# Altium PCB IR2104_SYNC_BUCK.PcbDoc
Units mm, origin at the board's own origin, x right, y up, seen from the top; angles counter-clockwise.
Board outline 100 x 100 mm, 2 copper layers (Top Layer, Bottom Layer); 62 components, 21 nets, 145 pads, 138 vias.
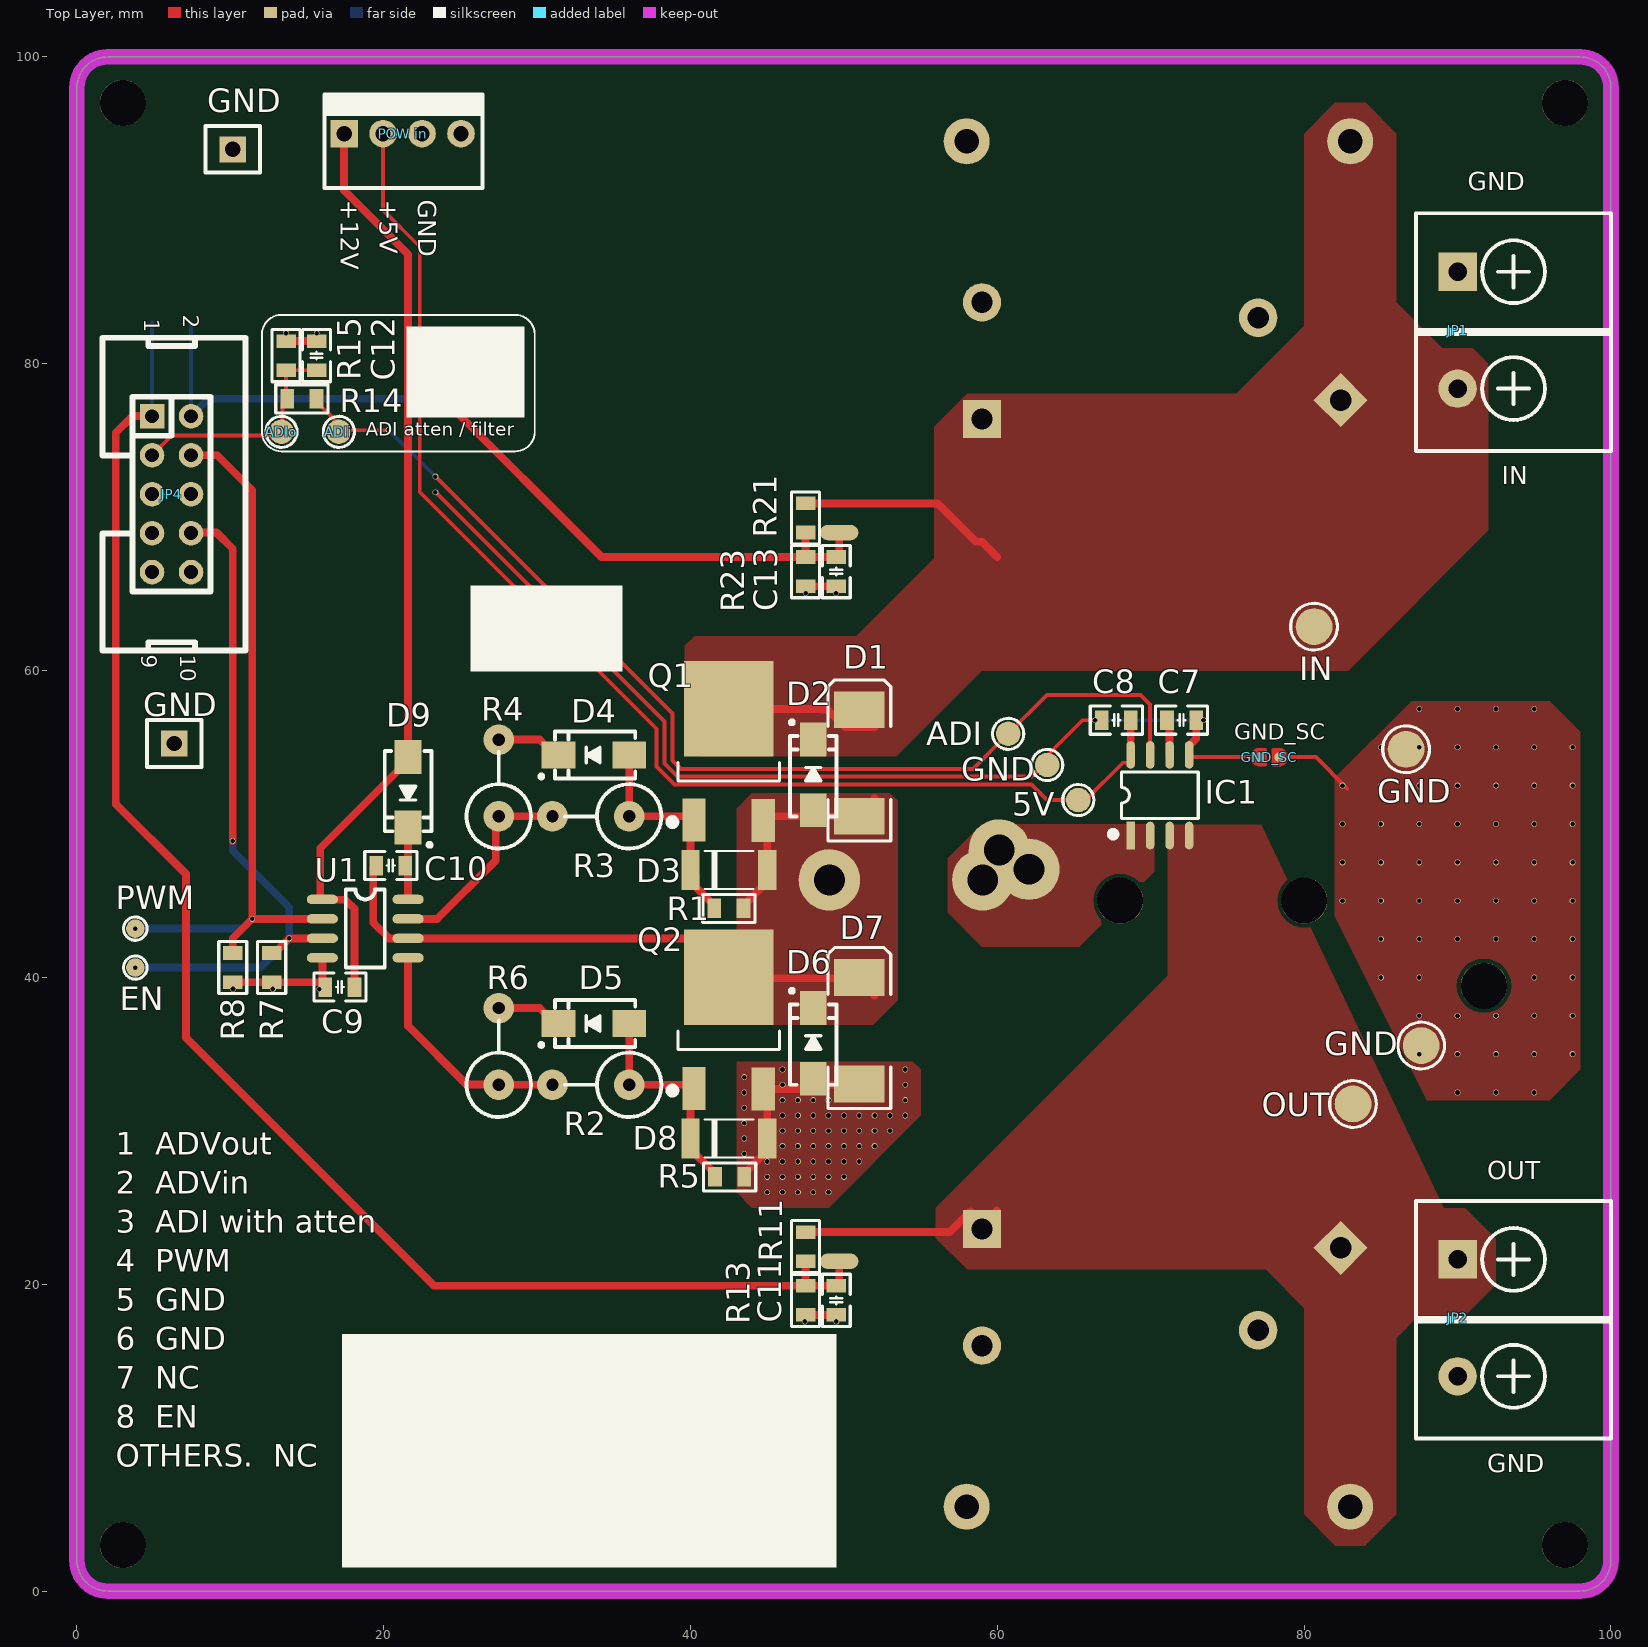
[diagram p0: Top Layer view]
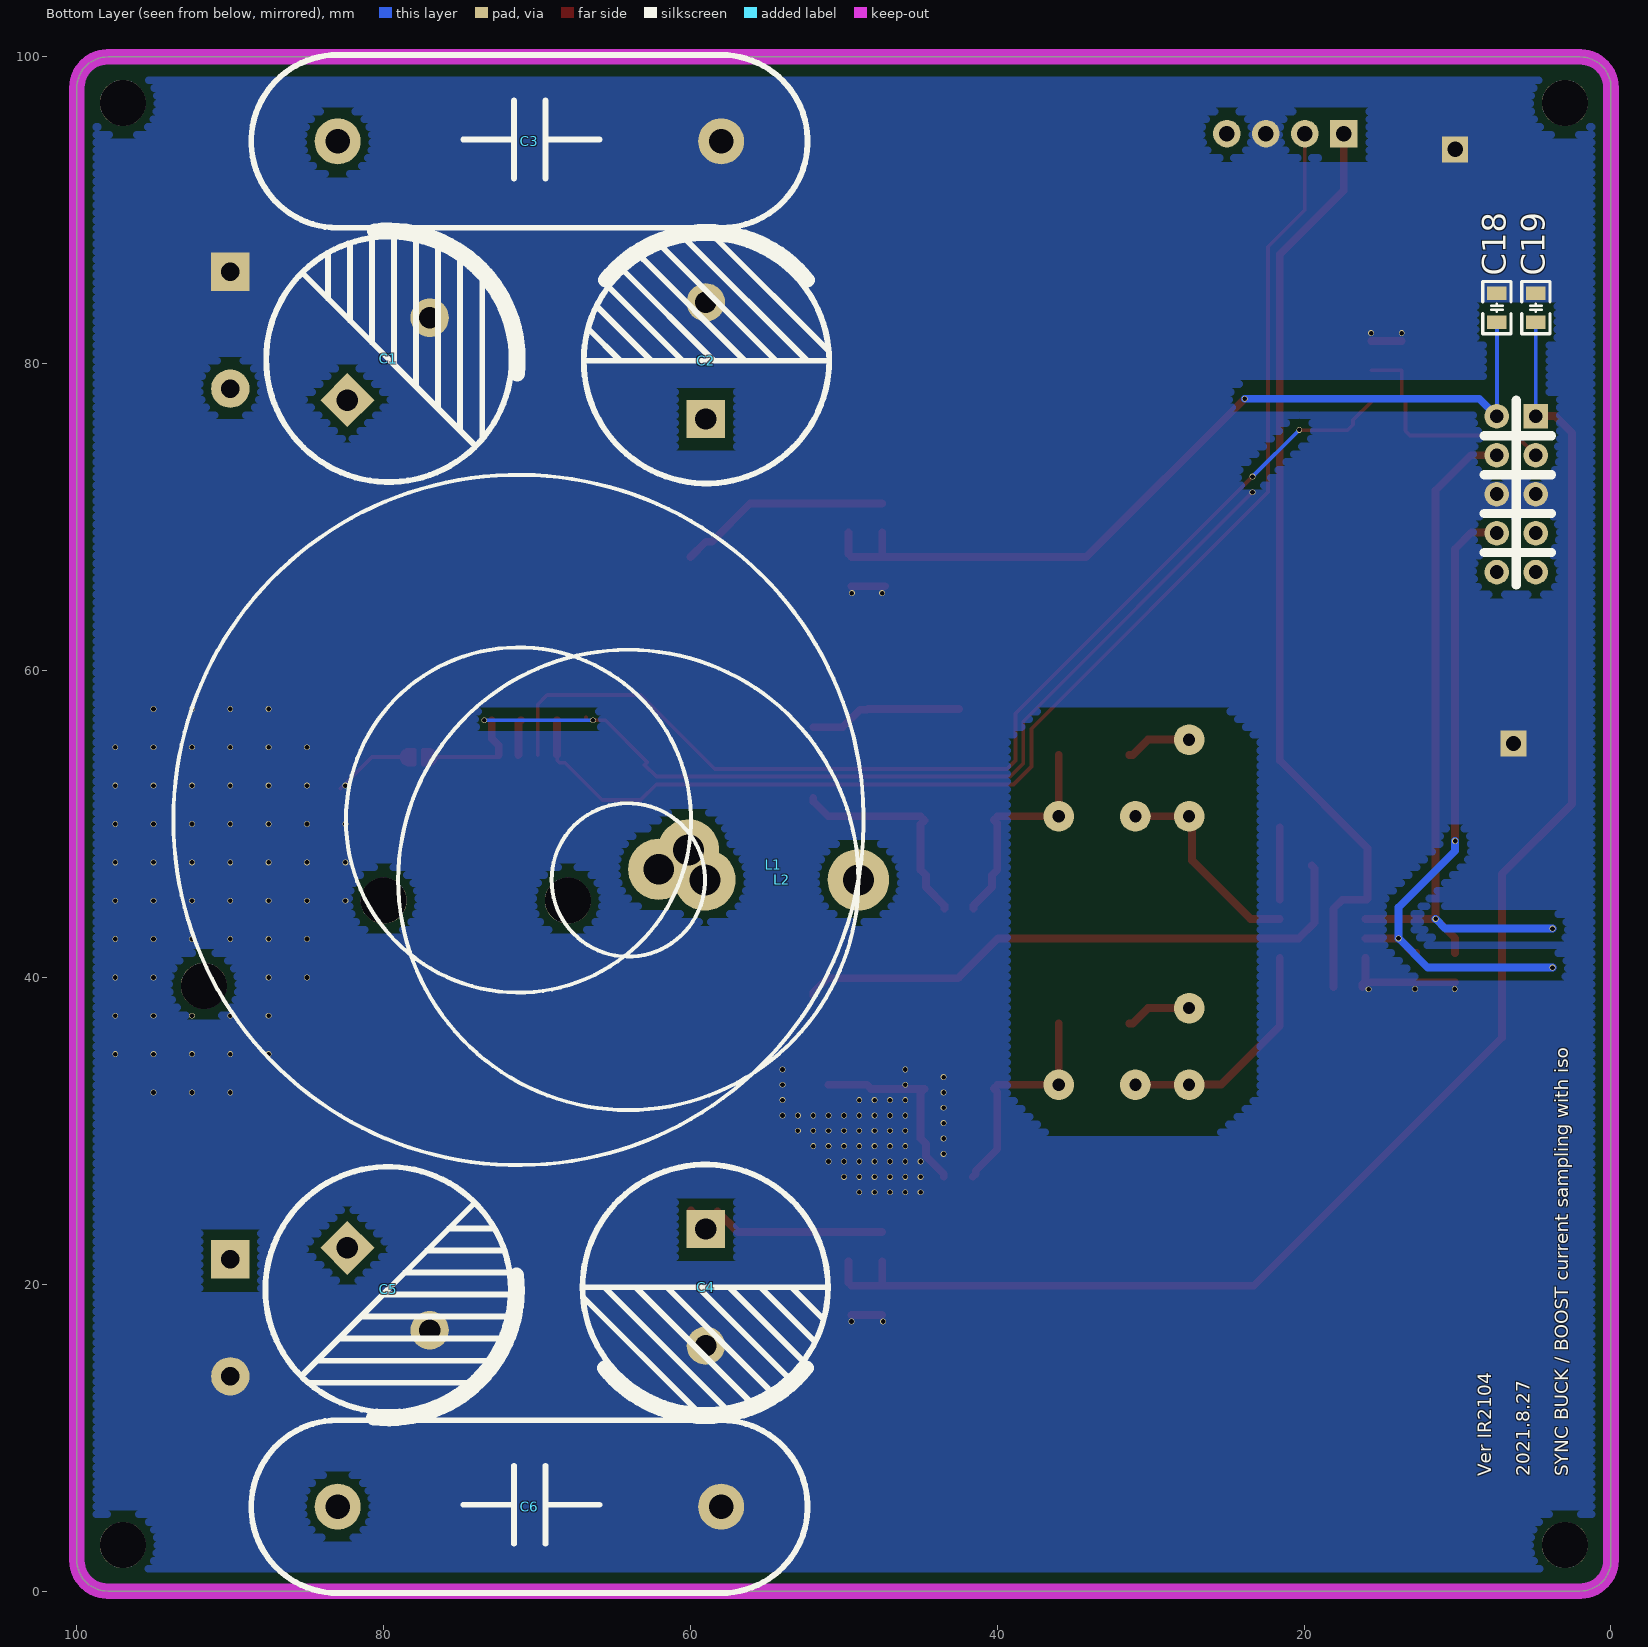
[diagram p1: Bottom Layer view, seen from below]

## Layer stack, top to bottom
Top Solder: solder mask 0.0102, Solder Resist, Dk 3.5
Top Layer: signal copper 0.0356
Dielectric 1: dielectric 0.32, FR-4, Dk 4.8
Bottom Layer: signal copper 0.0356
Bottom Solder: solder mask 0.0102, Solder Resist, Dk 3.5

## Board outline
0,2 0,98 cw(c2,98) 2,100 98,100 cw(c98,98) 100,98 100,2 cw(c98,2) 98,0 2,0 cw(c2,2)

## Design rules (kind name [scope] priority, off if disabled: settings)
Clearance GND [InNet('GND') And OnLayer('Bottom Layer')] p1: gap=0.254 ignorepadtopadclearanceinfootprint=TRUE except(0: Arc-Hole Track-Hole SMDPad-Hole THPad-Hole Via-Hole Text-Hole; 0.508: Arc-Fill Arc-Poly Arc-Region Track-Fill Track-Poly Track-Region SMDPad-Fill SMDPad-Poly SMDPad-Region THPad-Fill THPad-Poly THPad-Region Via-Fill Via-Poly Via-Region Fill-Fill Fill-Poly Fill-Region Fill-Hole Poly-Poly Poly-Region Poly-Hole Region-Region Region-Hole)
Clearance PGND_1 [InNet('PGND') And OnLayer('Bottom Layer')] p2: gap=0.254 ignorepadtopadclearanceinfootprint=TRUE except(0: Arc-Hole Track-Hole SMDPad-Hole THPad-Hole Via-Hole Text-Hole; 0.508: Arc-Fill Arc-Poly Arc-Region Track-Fill Track-Poly Track-Region SMDPad-Fill SMDPad-Poly SMDPad-Region THPad-Fill THPad-Poly THPad-Region Via-Fill Via-Poly Via-Region Fill-Fill Fill-Poly Fill-Region Fill-Hole Poly-Poly Poly-Region Poly-Hole Region-Region Region-Hole)
Clearance [All] p3: gap=0.254 ignorepadtopadclearanceinfootprint=TRUE except(0: Arc-Hole Track-Hole SMDPad-Hole THPad-Hole Via-Hole Fill-Text Poly-Text Region-Text Text-Hole)
HoleSize [All] p1 off: absolutevalues=TRUE maxlimit=2.54 minlimit=0.025 maxpercent=80.000 minpercent=20.000
MinimumSolderMaskSliver [All] p1 off: minsoldermaskwidth=0.254
PolygonConnect [All] p1: connectstyle=Direct reliefconductorwidth=0.254 reliefentries=4 polygonreliefangle="90 Angle" airgapwidth=0.254
RoutingVias [All] p1: holewidth=0.711 width=1.27 viastyle="Through Hole" minholewidth=0.711 minwidth=1.27 maxholewidth=0.711 maxwidth=1.27
SilkToSilkClearance [All] p1 off: silktosilkclearance=0.254
SilkToSolderMaskClearance [IsPad] p1 off: minsilkscreentomaskgap=0.254 clearancetoexposedcopper=TRUE
SolderMaskExpansion [All] p1: expansion=0.102 istentingtop=FALSE
Width [All] p1: maxlimit=2.54 minlimit=0.127 preferedwidth=0.254
26 further rules are at their usual default settings.

## Classes and differential pairs
component class IR2104_SYNC_BUCK_2021.7.31: 5V ADI ADIi ADIo C1 C2 C3 C4 C5 C6 C7 C8 C9 C10 C11 C12 C13 C18 C19 D1 D2 D3 D4 D5 D6 D7 D8 D9 EN GND GND_SC IC1 IN JP1 JP2 JP4 L1 L2 OUT "POW in" PWM Q1 Q2 R1 R2 R3 R4 R5 R6 R7 R8 R11 R13 R14 R15 R21 R23 U1

## Components (designator, comment, footprint, x,y, rotation, side; value= is the part's Value field where it differs from the comment)
5V "TEST" "TEST 1.6" 65.278,51.562 r180 top
ADI "TEST" "TEST 1.6" 60.706,55.88 r180 top
ADIi "TEST" "TEST 1.6" 17.078,75.566 r180 top
ADIo "TEST" "TEST 1.6" 13.335,75.565 r270 top
C1 "1000uF" "CAP 7.5*16*25" 79.66,80.286 r135 bottom
C2 "1000uF" "CAP 7.5*16*25" 58.962,80.2 r90 bottom
C3 "4.7uF" "CBB 25" 70.5,94.5 r0 bottom
C4 "1000uF" "CAP 7.5*16*25" 59.038,19.8 r270 bottom
C5 "1000uF" "CAP 7.5*16*25" 79.714,19.66 r225 bottom
C6 "4.7uF" "CBB 25" 70.5,5.5 r0 bottom
C7 "102" "C 0805_L" 72.009,56.768 r180 top
C8 "104" "C 0805_L" 67.757,56.768 r0 top
C9 "104" "C 0805_L" 17.145,39.37 r0 top
C10 "105" "C 0805_L" 20.462,47.293 r0 top
C11 "102" "C 0805_L" 49.5,18.95 r90 top
C12 "103" "C 0805_L" 15.621,80.528 r270 top
C13 "102" "C 0805_L" 49.5,66.45 r90 top
C18 "102" "C 0805_L" 7.442,83.655 r90 bottom
C19 "102" "C 0805_L" 4.902,83.655 r90 bottom
D1 "SS34" SMC 51,53.975 r90 top
D2 "SS34" SMA 48,53.2 r90 top
D3 "15V" LL41 42.345,46.828 r0 top
D4 "RS1M" SMA 33.7,54.5 r180 top
D5 "RS1M" SMA 33.7,37 r180 top
D6 "SS34" SMA 48,35.7 r90 top
D7 "SS34" SMC 51,36.525 r90 top
D8 "15V" LL41 42.345,29.328 r0 top
D9 "RS1M" SMA 21.59,52.07 r270 top
EN "TEST" "TEST 1.2" 3.81,40.64 r180 top
GND "TEST" "TEST 2.4" 86.644,54.87 r180 top
GND "TEST" "TEST 2.4" 87.63,35.56 r270 top
GND "TEST TP" "TEST TP1.4_B" 10.16,93.98 r180 top
GND "TEST TP" "TEST TP1.4_B" 6.35,55.245 r180 top
GND "TEST" "TEST 1.6" 63.246,53.848 r270 top
GND_SC "DEBUG PAD" DEBUG_B 77.724,54.356 r0 top
IC1 "ACS712" SOP8_N 70.595,51.875 r90 top
IN "TEST" "TEST 2.4" 80.645,62.865 r180 top
JP1 "HDR-1X2" KF7620-2P 93.65,82.19 r270 top
JP2 "HDR-1X2" KF7620-2P 93.65,17.81 r270 top
JP4 "Header 5X2" IDC2.54-LI-2x5P 4.902,76.581 r270 top
L1 "600uH" CS400125 71.213,50.262 r100 bottom
L2 "600uH" CS270125 64.055,46.355 r90 bottom
OUT "TEST" "TEST 2.4" 83.185,31.75 r180 top
"POW in" "HDR-1X4" KF2510-LI-4P 21.23,95 r0 top
PWM "TEST" "TEST 1.2" 3.81,43.18 r270 top
Q1 "AOD4184" TO252 42.5,53.3 r0 top
Q2 "AOD4184" TO252 42.5,35.8 r0 top
R1 "100K" "R 0805_L" 42.5,44.5 r0 top
R2 "10" "RS 1W-V5" 36,33 r180 top
R3 "10" "RS 1W-V5" 36,50.5 r180 top
R4 "10" "RS 1W-V5" 27.5,50.5 r90 top
R5 "100K" "R 0805_L" 42.55,27 r0 top
R6 "10" "RS 1W-V5" 27.5,33 r90 top
R7 "100K" "R 0805_L" 12.7,40.64 r270 top
R8 "100K" "R 0805_L" 10.16,40.64 r90 top
R11 "10K" "R 0805_L" 47.5,22.45 r90 top
R13 "1K" "R 0805_L" 47.5,18.95 r90 top
R14 "10K" "R 0805_L" 14.668,77.715 r180 top
R15 "10K" "R 0805_L" 13.64,80.528 r90 top
R21 "10K" "R 0805_L" 47.5,69.95 r90 top
R23 "1K" "R 0805_L" 47.5,66.45 r90 top
U1 "IR2104" SOP8 16.027,45.11 r0 top

## Footprints (in the part's own frame and the unit in brackets; to place one, negate y for a bottom-side part, rotate by r counter-clockwise, add the part's x,y. Pads: shape width x height; smd on the part's side, far side on the other; paste and mask are expansions set on the pad)
"C 0805_L" [mil] "无极性贴片电容"
  rect 35x50 smd: 1(-37.4,0) 2(37.4,0)
  silkscreen extent -67,-36 67,36, body extent -39,-24 39,24, height 20
"CAP 7.5*16*25" [mm] "脚距7.5mm直径16mm高度25mm"
  rect 2.5x2.5 hole 1.4: 1(-3.8,0.038)
  round 2.5 hole 1.4: 2(3.8,0.038)
  silkscreen extent -8,-8 8.42,8, body extent -8,-8 8.01,8, height 25.03
"CBB 25" [mm] "脚距25mm"
  round 3 hole 1.6: 1(-12.5,0) 2(12.5,0)
  silkscreen extent -18.13,-5.64 18.13,5.64
CS270125 [mm]
  round 4 hole 2: 1(0,-15) 2(0,-5)
  silkscreen extent -15,-15 15,15
CS400125 [mm]
  round 4 hole 2: 1(0,-22.5) 2(0,-11.25)
  silkscreen extent -22.5,-22.5 22.5,22.5
DEBUG_B [mm] "调试断点焊盘"
  round 0.6 smd paste-0.6: 1(-0.635,0) 2(0.635,0)
  Top Layer region: 0.254,-0.508 0.762,-0.508 0.908,-0.479 1.031,-0.396 1.114,-0.273 1.143,-0.127 1.143,-0.127 1.143,0 1.104,0.194 0.994,0.359 0.829,0.469 0.635,0.508 0.635,0.508 0.254,0.508
  Top Layer region: -0.254,0.508 -0.762,0.508 -0.908,0.479 -1.031,0.396 -1.114,0.273 -1.143,0.127 -1.143,0.127 -1.143,0 -1.104,-0.194 -0.994,-0.359 -0.829,-0.469 -0.635,-0.508 -0.635,-0.508 -0.254,-0.508
  Top Layer lines w0.203: -1.143,0 ccw(c-0.635,0) -0.635,-0.508 -0.254,-0.508 -0.254,0 -0.254,0.508 -0.635,0.508 ccw(c-0.635,0) -1.143,0 ; 0.254,-0.508 0.635,-0.508 ccw(c0.635,0) 1.143,0 ccw(c0.635,0) 0.635,0.508 0.254,0.508 0.254,0 0.254,-0.508
IDC2.54-LI-2x5P [mm] "10P简易牛角座"
  rect 1.6x1.6 hole 0.9: 1(0,0)
  round 1.6 hole 0.9: 2(0,2.54) 3(2.54,0) 4(2.54,2.54) 5(5.08,0) 6(5.08,2.54) 7(7.62,0) 8(7.62,2.54) 9(10.16,0) 10(10.16,2.54)
  silkscreen extent -5.11,-3.23 15.27,6.1, body extent -5.08,-3.08 15.24,5.77, height 9.17
KF2510-LI-4P [mm] "接插件/2A"
  rect 1.8x1.8 hole 1: 1(-3.81,0)
  round 1.8 hole 1: 2(-1.27,0) 3(1.27,0) 4(3.81,0)
  silkscreen extent -5.08,-3.56 5.21,2.54, body extent -5.08,-3.5 5.08,2.4, height 11.05
KF7620-2P [mm] "15.2*12*12mm(长宽高)"
  rect 2.5x2.5 hole 1.2: 1(-3.81,-3.65)
  round 2.5 hole 1.2: 2(3.81,-3.65)
  silkscreen extent -7.62,-6.35 7.87,6.35, body extent -7.62,-6.2 8.32,6.2, height 12.45
LL41 [mm]
  rect 1.2x2.6 smd: 1(2.655,0.172) 2(-2.345,0.172)
  silkscreen extent -1.44,-1.08 1.76,1.42
"R 0805_L" [mil] "1/8W贴片电阻   https://item.taobao.com/item.htm?ft=t&id=613637044352"
  rect 35x50 smd: 1(-37.4,0) 2(37.4,0)
  silkscreen extent -67,-36 67,36, body extent -39,-25 39,25, height 20
"RS 1W-V5" [mm] "直插色环电阻，脚距5mm，直径4mm"
  round 2 hole 0.8: 1(0,0) 2(5,0)
  silkscreen extent -2.1,-2.1 4.2,2.1, body extent -2.01,-2.01 5.3,2.01, height 13.3
SMA [mm] "4.5x2.6*2.2mm（长宽高，不包括引脚）"
  rect 2.2x1.75 smd: 1(-2.3,0) 2(2.3,0)
  silkscreen extent -2.7,-1.52 3.56,1.52, body extent -2.53,-1.3 2.58,1.3, height 2.15
SMC [mm] "DO-214-AB/SMC; 2 C-Bend Leads; Body 7.9 x 5.9 mm, inc. leads (LxW)"
  rect 2.4x3.3 smd: 1(-3.475,0) 2(3.475,0)
  silkscreen extent -5.07,-2.05 5.43,2.05
SOP8 [mil] "https://item.taobao.com/item.htm?ft=t&id=613637044352"
  oval 80x24 smd: 1(-1,-1) 2(-1,-51) 3(-1,-101) 4(-1,-151) 5(219,-151) 6(219,-101) 7(219,-51) 8(219,-1)
  silkscreen extent 59,-176 159,24, body extent -4,-174 234,24, height 63
SOP8_N [mm] "5*6*1.8mm（长宽高）淘宝ID:小糖豆的小窝窝"
  rect 1.8x0.55 smd: 1(-2.625,1.905)
  oval 1.8x0.55 smd: 2(-2.625,0.635) 3(-2.625,-0.635) 4(-2.625,-1.905) 5(2.625,-1.905) 6(2.625,-0.635) 7(2.625,0.635) 8(2.625,1.905)
  silkscreen extent -2.69,-2.5 1.52,3.2, body extent -3,-2.5 3,2.5, height 1.9
"TEST 1.2" [mm] "测试点1.2mm"
  round 1.2 smd paste-1.2: 1(0,0)
  silkscreen extent -0.76,-0.76 0.76,0.76
"TEST 1.6" [mm] "测试点1.6mm"
  round 1.6 smd paste-1.6: 1(0,0)
  silkscreen extent -1.02,-1.02 1.01,1.02
"TEST 2.4" [mm] "测试点2.4mm"
  round 2.4 smd paste-2.4: 1(0,0)
  silkscreen extent -1.52,-1.52 1.52,1.52
"TEST TP1.4_B" [mm] "蓝色，测试环"
  rect 1.7x1.7 hole 1: 1(0,0)
  silkscreen extent -1.78,-1.52 1.78,1.52, body extent -1.67,-1.4 1.67,1.4, height 5.41
TO252 [mil] "252晶体管"
  rect 60x110 smd: 1(-89.55,-119.77) 3(88.45,-120.77)
  rect 230x245 smd: 2(0,165.35)
  silkscreen extent -153,-133 130,28, body extent -128,-120 128,251, height 91

## Part data
5V ADI ADIi ADIo EN GND GND GND IN OUT PWM: "测试点", BOM名称=测试点, 下单链接=https://item.taobao.com/item.htm?ft=t&id=613637044352, 淘宝ID=小糖豆的小窝窝
C1 C2 C4 C5: library part CE, "直插电解电容", BOM名称=直插电解电容, 下单链接=https://item.taobao.com/item.htm?ft=t&id=613637044352, 淘宝ID=小糖豆的小窝窝
C3 C6: library part CBB, "CBB电容", BOM名称=CBB电容, 下单链接=https://item.taobao.com/item.htm?ft=t&id=613637044352, 淘宝ID=小糖豆的小窝窝
C7 C8 C9 C10 C11 C12 C13 C18 C19: library part C, "贴片电容", BOM名称=贴片电容, 下单链接=https://item.taobao.com/item.htm?ft=t&id=613637044352, 淘宝ID=小糖豆的小窝窝
D1 D2 D4 D5 D6 D7 D9: library part 1N4007, "整流二极管", BOM名称=整流二极管, 下单链接=https://item.taobao.com/item.htm?ft=t&id=613637044352, 淘宝ID=小糖豆的小窝窝
D3 D8: library part "D Zener", "Zener Diode", LatestRevisionDate=17-Jul-2002, LatestRevisionNote="Re-released for DXP Platform.", PackageDescription="Diode, Thru-Hole; 2 Leads; 0.7 in Pin Spacing", PackageReference=DIODE-0.7, Published=8-Jun-2000, Publisher="Altium Limited"
GND GND: "测试环", BOM名称=测试环, 下单链接=https://item.taobao.com/item.htm?ft=t&id=613637044352, 淘宝ID=小糖豆的小窝窝
GND_SC: library part DEBUG, "调试断点焊盘", BOM名称=调试断点焊盘, 下单链接=https://item.taobao.com/item.htm?ft=t&id=613637044352, 淘宝ID=小糖豆的小窝窝
IC1: "电流检测芯片", Alias1=https://item.taobao.com/item.htm?ft=t&id=613637044352, BOM名称=电流检测芯片, 淘宝ID=小糖豆的小窝窝
JP1 JP2: library part "Header 2", "2P接插件", BOM名称=2P接插件, 下单链接=https://item.taobao.com/item.htm?ft=t&id=613637044352, 淘宝ID=小糖豆的小窝窝
JP4: "5*2P接插件", BOM名称=5*2P接插件, 下单链接=https://item.taobao.com/item.htm?ft=t&id=613637044352, 淘宝ID=小糖豆的小窝窝
L1 L2: library part L-MR, "功率磁环电感", BOM名称=功率磁环电感, 下单链接=https://item.taobao.com/item.htm?ft=t&id=613637044352, 淘宝ID=小糖豆的小窝窝
"POW in": library part "Header 4", "4P接插件", BOM名称=4P接插件, 下单链接=https://item.taobao.com/item.htm?ft=t&id=613637044352, 淘宝ID=小糖豆的小窝窝
Q1 Q2: library part IRF3710, "N沟场效应管", BOM名称=N沟场效应管, 下单链接=https://item.taobao.com/item.htm?ft=t&id=613637044352, 淘宝ID=小糖豆的小窝窝
R1 R5 R7 R8 R11 R13 R14 R15 R21 R23: library part R, "贴片电阻", BOM名称=贴片电阻, 下单链接=https://item.taobao.com/item.htm?ft=t&id=613637044352, 淘宝ID=小糖豆的小窝窝
R2 R3 R4 R6: library part Res, "色环电阻", BOM名称=色环电阻, 下单链接=https://item.taobao.com/item.htm?ft=t&id=613637044352, 淘宝ID=小糖豆的小窝窝

## Free pads (board coordinates)
  round 3 hole 3: Q(3,3) Q(3,97) Q(68,45) Q(80,45) Q(91.721,39.455) Q(97,3) Q(97,97)
  oval 2.5x1 smd: Q(49.693,21.495) Q(49.693,68.995)
  round 4 hole 2: Q(62.064,47.05)

## Via types
v1: diameter 0.381, hole 0.305, Top Layer to Bottom Layer, 138 vias

## Nets (pads, with @x,y where several pads share a name; then routed paths per layer and width w, separated by ;. In a path a pad name is that pad's centre, name@x,y a point inside that pad or via, vN(x,y) a via of type N, cw(c..) or ccw(c..) an arc to the next point about the centre after c; other vN are vias at no path point)
+5: 5V.1 "POW in.2" C8.2 IC1.8 | length 84.2
  Top Layer w0.254: 19.96,95 19.96,90.022 22.352,87.63 22.352,71.628 37.773,56.207 37.773,53.754 38.949,52.578 62.232,52.578 63.248,51.562 65.752,51.562 68.183,53.993 68.553,53.993 68.69,54.13 IC1.8 IC1.8@68.698,54.508
  Top Layer w0.508: IC1.8@68.698,54.508 68.698,56.759 C8.2
+12: "POW in.1" C9.2 D9.1 U1.1 | length 61.5
  Top Layer w0.508: U1.1@15.917,45.085 15.87,45.132 15.87,48.425 21.59,54.145 D9.1 21.59,87.122 17.42,91.292 17.42,95 ; U1.1 16.021,45.066 17.5,45.066 18.095,44.471 C9.2
ADI: ADI.1 ADIi.1 IC1.7 R14.1 | length 72
  Top Layer w0.254: R14.1 15.618,77.525 16.82,76.322 16.82,76.027 17.18,75.668 20.296,75.668 v1(20.32,75.692) ; v1(23.368,72.644) 38.82,57.192 38.82,54.144 39.37,53.594 58.42,53.594 ADI.1 63.246,58.42 69.342,58.42 69.96,57.802 IC1.7
  Bottom Layer w0.254: v1(20.32,75.692) v1(23.368,72.644)
ADVin: C13.2 C18.1 JP4.2 pad.Q@49.693,68.995 R21.1 R23.2 | length 55.9
  Top Layer w0.508: v1(23.876,77.724) 34.2,67.4 R23.2 ; R21.1 R23.2 ; C13.2 R23.2 ; C13.2@49.693,67.591 pad.Q@49.693,68.995
  Bottom Layer w0.254: JP4.2 C18.1
  Bottom Layer w0.508: JP4.2 8.585,77.724 v1(23.876,77.724)
ADVout: C11.2 C19.1 JP4.1 pad.Q@49.693,21.495 R11.1 R13.2 | length 102.6
  Top Layer w0.508: JP4.1 4.887,76.596 3.638,76.596 2.54,75.498 2.54,51.308 7.112,46.736 7.112,36.068 23.28,19.9 R13.2 ; R11.1 R13.2 ; pad.Q@49.693,21.495 49.693,20.09 49.502,19.9 C11.2 R13.2
  Bottom Layer w0.254: JP4.1 C19.1
EN: EN.1 JP4.8 R7.1 U1.3 | length 44.6
  Top Layer w0.508: JP4.8 7.486,69.005 9.1,69.005 10.16,67.945 v1(10.16,48.895) ; R7.1 12.89,41.59 v1(13.845,42.545) U1.3
  Bottom Layer w0.508: v1(3.81,40.64) 11.94,40.64 v1(13.845,42.545) 13.845,44.575 10.16,48.26 v1(10.16,48.895)
GND: "POW in.3" C1.2 C2.2 C3.1 C4.2 C5.2 C6.1 C7.1 C8.1 C9.1 C11.1 C12.1 C13.1 C18.2 C19.2 D6.1 D7.1 D8.1 GND.1 GND_SC.1 GND_SC.2 IC1.5 JP1.1 JP2.2 JP4.5 JP4.6 Q2.3 R5.2 R7.2 R8.1 R13.1 R15.2 R23.1 U1.4 | length 100.9
  Top Layer w0.254: v1(23.368,71.628) 38.312,56.684 38.312,53.933 39.16,53.086 62.23,53.086 62.992,53.848 GND.1@62.831,54.009 ; GND.1@62.832,54.052 65.545,56.765 v1(66.361,56.765) ; C8.1 C8.1@66.807,56.959 ; IC1.5 72.5,54.493 72.637,54.356 76.581,54.356 ; GND_SC.1@76.962,54.356 76.581,54.356 ; GND_SC.1 76.581,54.356 ; 78.74,54.356 78.867,54.356 80.772,54.356 82.804,52.324
  Top Layer w0.508: R8.1 16.004,39.69 C9.1@16.195,39.499 ; R15.2 C12.1 ; U1.4 16.002,39.753 16.195,39.56 C9.1@16.195,39.499 ; C9.1 C9.1@16.195,39.499 ; R5.2 43.5,27.19 44.654,28.345 44.654,29.154 D8.1 45,32.479 Q2.3 48.232,32.732 48.5,33 D7.1@51.025,33 ; R23.1@47.31,65.5 R23.1 C13.1 ; R13.1 C11.1 ; IC1.5 72.5,55.114 72.959,55.573 C7.1
  Bottom Layer w0.254: v1@66.343,56.771 66.351,56.763 73.44,56.763 v1(73.442,56.76)
  other v1: 47.442,17.573 49.506,17.573 45,26 46,26 47,26 48,26 49,26 45,27 46,27 47,27 48,27 49,27 50,27 45,28 46,28 47,28 48,28 49,28 50,28 51,28 43.5,28.5 46,29 47,29 48,29 49,29 50,29 51,29 52,29 43.5,29.5 46,30 47,30 48,30 49,30 50,30 51,30 52,30 53,30 43.5,30.5 46,31 47,31 48,31 49,31 50,31 51,31 52,31 53,31 54,31 43.5,31.5 46,32 47,32 48,32 49,32 54,32 43.5,32.5 90,32.5 92.5,32.5 95,32.5 46,33 54,33 43.5,33.5 46,34 54,34 87.5,35 90,35 92.5,35 95,35 97.5,35 87.5,37.5 90,37.5 92.5,37.5 95,37.5 97.5,37.5 15.796,39.231 10.181,39.248 12.776,39.245 85,40 87.5,40 95,40 97.5,40 85,42.5 87.5,42.5 90,42.5 92.5,42.5 95,42.5 97.5,42.5 82.5,45 85,45 87.5,45 90,45 92.5,45 95,45 97.5,45 82.5,47.5 85,47.5 87.5,47.5 90,47.5 92.5,47.5 95,47.5 97.5,47.5 82.5,50 85,50 87.5,50 90,50 92.5,50 95,50 97.5,50 82.5,52.5 85,52.5 87.5,52.5 90,52.5 92.5,52.5 95,52.5 97.5,52.5 85,55 87.5,55 90,55 92.5,55 95,55 97.5,55 87.5,57.5 90,57.5 92.5,57.5 95,57.5 47.508,65.049 49.484,65.049 13.635,81.995 15.635,81.995
HO: R3.2 R4.1 U1.7 | length 13.7
  Top Layer w0.508: U1.7 23.495,43.815 27.305,47.625 27.305,50.305 R4.1 R3.2
IN: C1.1 C2.1 C3.2 D1.2 D2.2 IN.1 JP1.2 Q1.2 R21.2 | length 23.9
  Top Layer w0.508: Q1.2 48.45,57.5 48.5,57.45 48.95,57.45 50.1,56.3 D1.2@52,56.3 ; R21.2 56.1,70.9 58.604,68.396 59.004,68.396 60,67.4
LO: R2.2 R6.1 U1.5 | length 15.4
  Top Layer w0.508: U1.5 21.59,36.83 25.4,33.02 27.48,33.02 R6.1 R2.2
NetADIo_1: ADIo.1 C12.2 JP4.3 R14.2 R15.1 | length 15.2
  Top Layer w0.254: JP4.3 6.187,75.326 13.096,75.326 13.4,75.63 13.4,77.553 13.64,77.793 R15.1 C12.2
NetC7_2: C7.2 IC1.6 | length 2.3
  Top Layer w0.508: C7.2 71.222,56.605 71.222,54.508 IC1.6
NetD3_2: D3.2 D4.1 Q1.1 R1.1 R3.1 | length 14.8
  Top Layer w0.508: D4.1 R3.1 39.983,50.5 Q1.1 40,50.032 D3.2 40.346,46.654 40.346,45.894 41.55,44.69 R1.1
NetD4_2: D4.2 R4.2 | length 4.3
  Top Layer w0.508: R4.2 30.175,55.5 31.175,54.5 D4.2
NetD5_1: D5.1 D8.2 Q2.1 R2.1 R5.1 | length 14.8
  Top Layer w0.508: D5.1 R2.1 39.983,33 Q2.1 40,32.532 D8.2 40,28.8 41.41,27.391 41.41,27.19 R5.1
NetD5_2: D5.2 R6.2 | length 4.3
  Top Layer w0.508: R6.2 30.175,38 31.175,37 D5.2
NetIC1_1: IC1.1 IC1.2 L1.2 L2.2 pad.Q@62.064,47.05
OUT: C4.1 C5.1 C6.2 IC1.3 IC1.4 JP2.1 OUT.1 R11.2 | length 12.1
  Top Layer w0.508: R11.2 56.9,23.4 C4.1@58.25,24.75 ; C4.1@59.409,24.247 C4.1@59.962,24.8
PWM: JP4.4 PWM.1 R8.2 U1.2 | length 48.1
  Top Layer w0.508: JP4.4 9.144,74.041 11.43,71.755 v1(11.43,43.815) ; R8.2 10.16,42.545 v1(11.43,43.815) ; U1.2 v1(11.43,43.815)
  Bottom Layer w0.508: v1(3.81,43.18) 10.795,43.18 v1(11.43,43.815)
VB: C10.2 D9.2 U1.8 | length 4.7
  Top Layer w0.508: U1.8 21.59,47.198 D9.2
VS: C10.1 D1.1 D2.1 D3.1 D6.2 D7.2 L1.1 L2.1 Q1.3 Q2.2 R1.2 U1.6 | length 53.1
  Top Layer w0.508: C10.1 19.325,47.106 19.325,43.572 20.351,42.545 U1.6 39.955,42.545 Q2.2 42.55,39.95 48.5,39.95 51.075,39.95 52,39.025 52,38.8 ; R1.2 43.45,44.69 44.654,45.895 44.654,46.654 D3.1 45,49.979 Q1.3 45.014,50.5 48.5,50.5 51.025,50.5 52,51.475 D1.1@52,51.7
pads on no net: "POW in.4" JP4.7 JP4.9 JP4.10

## Polygon pours and split planes (outlines as drawn)
GND on Top Layer "NONET_L02_P-001" (solid, remove dead copper, pour order 17): 82,53 87,58 96,58 98,56 98,34 96,32 88,32 82,44
OUT on Top Layer "Top Layer-OUT" (solid, remove dead copper, pour order 13): 77.485,20.965 80,18.45 80,5 82.035,2.965 83.965,2.965 86,5 86,16.48 87.485,17.965 90.485,17.965 92.485,19.965 92.485,22.965 90.485,24.965 89.104,24.965 77.199,49.965 71.12,49.965 71.12,40.12 56,25 56,23 58.035,20.965
IN on Top Layer "NONET_L02_P-001" (solid, remove dead copper, pour order 12): 92,80 92,69.14 82.86,60 59,60 53.401,54.401 40.599,54.401 39.613,55.387 39.613,61.613 40.278,62.23 50.8,62.23 55.88,67.31 55.88,75.88 58.05,78.05 75.565,78.05 80,82.485 80,95 82,97 84,97 86,95 86,84 89,81 91,81
GND on Top Layer "NONET_L02_P-001" (solid, remove dead copper, pour order 16): 43,34.5 43,26 44,25 49,25 55,31 55,34 54.5,34.5
VS on Top Layer "NONET_L02_P-001" (solid, remove dead copper, pour order 15): 50,52 44,52 43,51 43,37.5 43.59,36.91 51.91,36.91 53.5,38.5 53.5,51.5 53,52
NetIC1_1 on Top Layer "NONET_L02_P-001" (solid, remove dead copper, pour order 14): 56.757,47.757 56.757,44.243 59,42 65.352,42 70.231,46.879 70.231,50 59,50
GND on Bottom Layer "NONET_L02_P-001" (hatched Horizontal grid 0.508 track 0.508, remove dead copper, pour order 11): -27.432,1.016 -17.272,-9.144 118.872,-9.144 118.872,75.184 127.508,83.82 106.172,105.156 -10.16,105.156 -18.796,96.52

## Keep-outs
Keep-Out Layer:
  lines w1.016: 100,98 ccw(c98,98) 98,100 2,100 ccw(c2,98) 0,98 0,2 ccw(c2,2) 2,0 98,0 ccw(c98,2) 100,2 100,98 ; 100,98 100,98

## Other copper
Bottom Layer:
  pour cut-out: 65.786,57.15 65.786,56.388 66.04,56.134 73.787,56.134 74.041,56.388 74.041,57.15 73.787,57.404 66.04,57.404
  pour cut-out: 39.361,55.381 36.957,57.785 25.273,57.785 22.86,55.372 22.86,32.354 25.497,29.845 36.83,29.845 39.38,32.395

## Silkscreen, mask and mechanical layers (free items; w line width, h text height)
Top Overlay:
  rectangle: 25.654,59.944 35.56,65.532
  rectangle: 17.272,1.524 49.53,16.764
  rectangle: 21.475,76.489 29.193,82.432
  lines w0.127: 22.225,74.295 13.335,74.295 ; 13.335,74.295 cw(c13.335,75.565) 12.065,75.565 12.065,81.915 cw(c13.335,81.915) 13.335,83.185 28.575,83.185 cw(c28.575,81.915) 29.845,81.915 29.845,75.565 cw(c28.575,75.565) 28.575,74.295 13.335,74.295
  text "GND" at 90.678,90.932 h2.03
  text "+12V" at 16.797,90.696 h2.03 r270
  text "+5V" at 19.337,90.696 h2.03 r270
  text "GND" at 21.877,90.696 h2.03 r270
  text "ADI atten / filter" at 18.838,75.019 h1.52
  text "IN" at 92.868,71.758 h2.03
  text "GND_SC" at 75.438,55.118 h1.78
  text "1  ADVout" at 2.54,27.94 h2.54
  text "OUT" at 91.928,26.455 h2.03
  text "2  ADVin" at 2.54,25.4 h2.54
  text "3  ADI with atten" at 2.54,22.86 h2.54
  text "4  PWM" at 2.54,20.32 h2.54
  text "5  GND" at 2.54,17.78 h2.54
  text "6  GND" at 2.54,15.24 h2.54
  text "7  NC" at 2.54,12.7 h2.54
  text "8  EN" at 2.54,10.16 h2.54
  text "OTHERS.  NC" at 2.54,7.62 h2.54
  text "GND" at 91.948,7.366 h2.03
Bottom Overlay:
  text "SYNC BUCK / BOOST current sampling with iso" at 2.5,7.5 h1.52 r270
  text "2021.8.27" at 5,7.5 h1.52 r270
  text "Ver IR2104" at 7.5,7.5 h1.52 r270
Top Solder:
  lines w1.27: 53.34,60.96 57.15,64.77 78.105,64.77 86.995,73.66 ; 54.61,58.42 58.42,62.23 59.69,62.23 78.105,62.23 ; 57.15,69.85 62.23,74.93 76.2,74.93 81.28,80.01 81.28,90.17 81.28,91.44 ; 57.785,67.31 76.2,67.31 85.09,76.2 85.09,91.44 ; 60.96,69.85 74.93,69.85 ; 61.595,26.035 74.93,39.37 74.93,45.72 ; 63.5,72.39 77.47,72.39 80.01,74.93 ; 68.58,25.4 82.55,25.4 ; 78.74,39.37 64.77,25.4 62.23,22.86 77.47,22.86 81.28,19.05 81.28,7.62 ; 80.01,36.83 71.12,27.94 81.28,27.94 86.36,27.94 ; 82.55,64.77 90.17,72.39 ; 85.09,7.62 85.09,21.59 ; 85.09,20.32 85.09,24.13
Mechanical 1:
  lines w0.254: 100.127,2 ccw(c100,2) 100.127,2.002 ; 100.127,2 ccw(c100,2) 100.127,2.002 ; 100.127,2 cw(c98,2) 98,-0.127 2,-0.127 cw(c2,2) -0.127,2 -0.127,98 cw(c2,98) 2,100.127 98,100.127 cw(c98,98) 100.127,98 100.127,2.002 ; 100.127,2 100.127,2.002
Mechanical 13:
  lines w0.254: 100.127,2 ccw(c100,2) 100.127,2.002 ; 100.127,2 ccw(c100,2) 100.127,2.002 ; 100.127,2 cw(c98,2) 98,-0.127 2,-0.127 cw(c2,2) -0.127,2 -0.127,98 cw(c2,98) 2,100.127 98,100.127 cw(c98,98) 100.127,98 100.127,2.002 ; 100.127,2 100.127,2.002

## Text inside footprints (layer, text, board x,y; h text height)
JP4: Top Overlay "10" at 6.731,61.036 h1.02 r270; Top Overlay "9" at 4.191,61.036 h1.02 r270; Top Overlay "1" at 4.394,82.931 h1.02 r270; Top Overlay "2" at 6.934,83.185 h1.02 r270